# Altium PCB XoomFloppy Pro.PcbDoc (part 1 of 2)
Units mm, origin at the board's own origin, x right, y up, seen from the top; angles counter-clockwise.
Board outline 99.59 x 50.28 mm, 2 copper layers (Top Layer, Bottom Layer), stack 1.569 mm thick; 33 components, 43 nets, 246 pads, 112 vias.
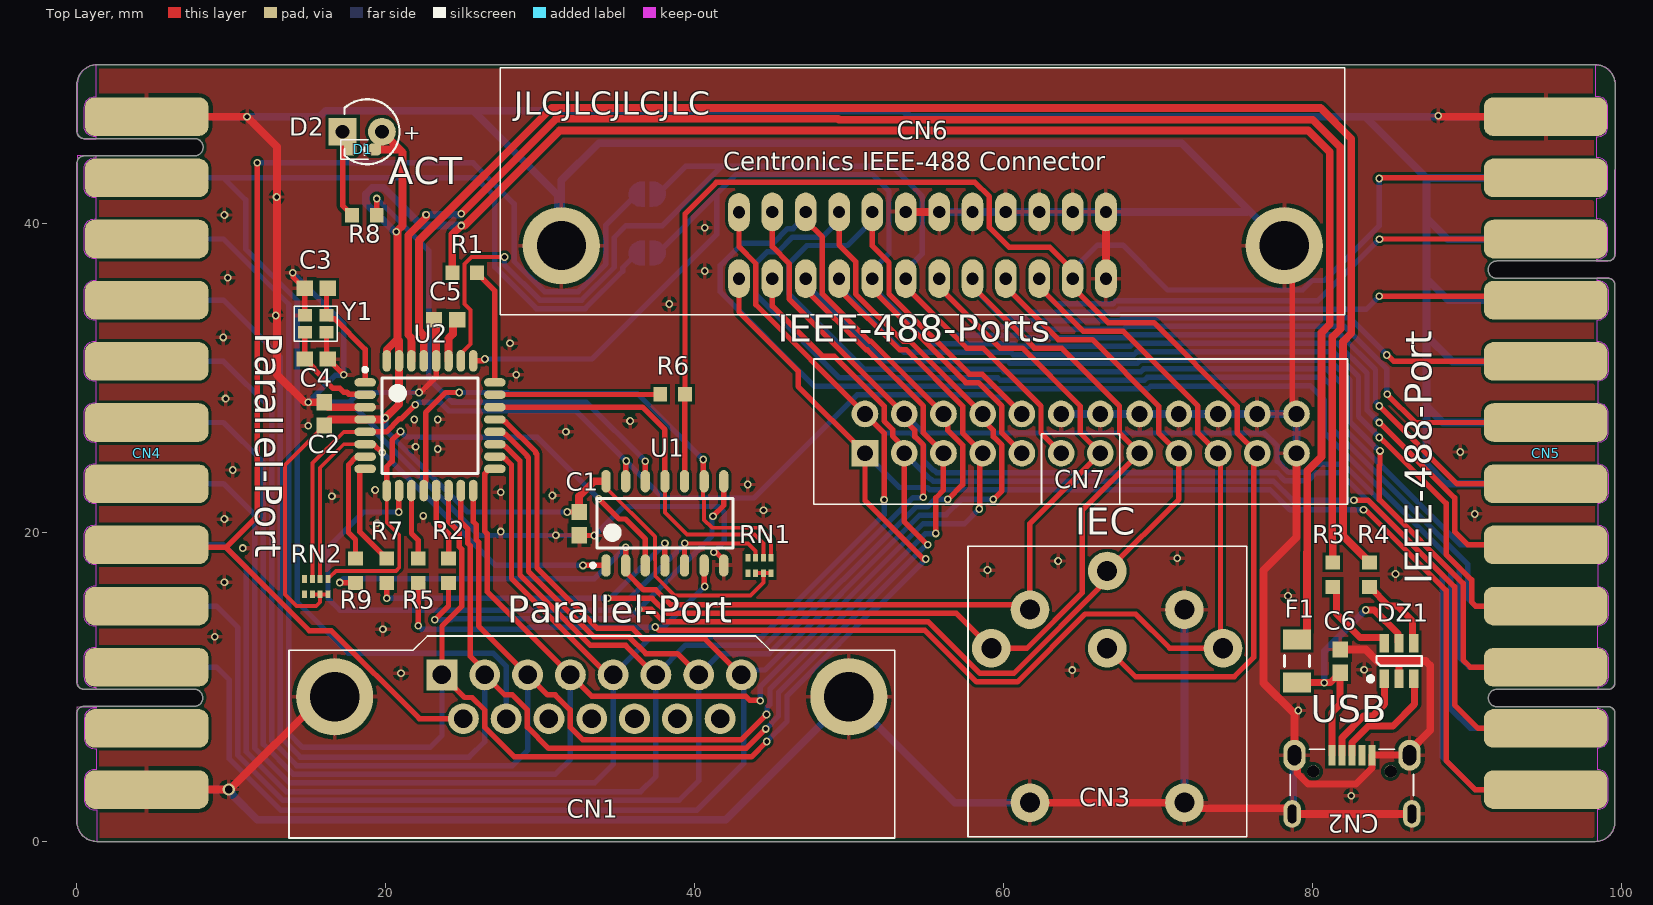
[diagram p0: Top Layer view]
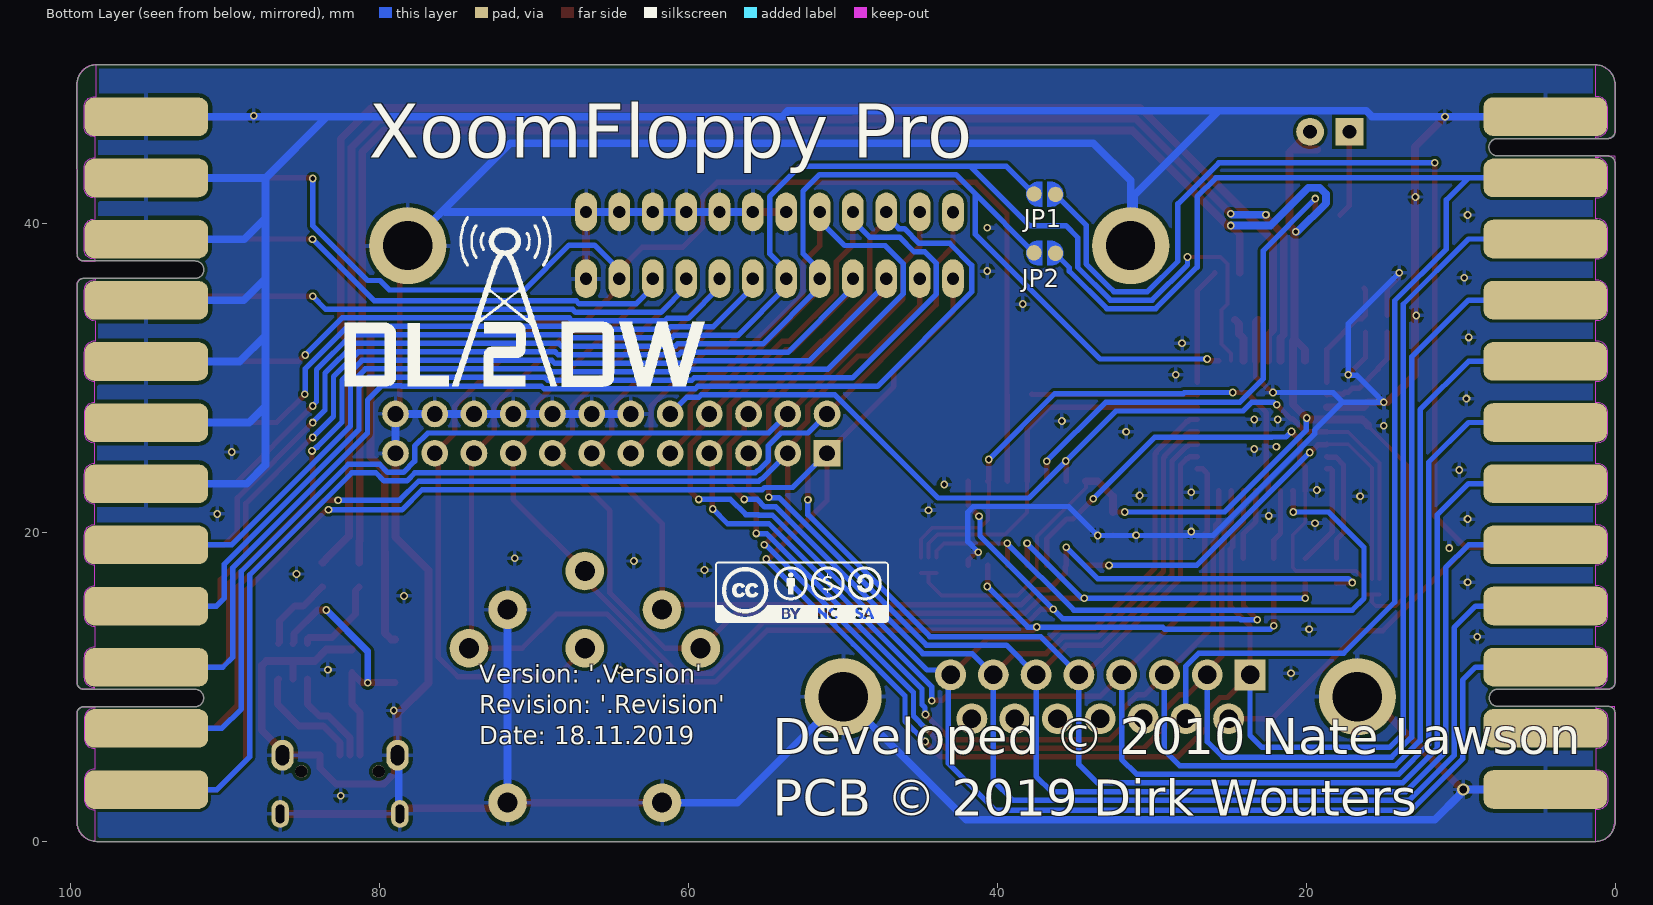
[diagram p1: Bottom Layer view, seen from below]

## Layer stack, top to bottom
Top Solder: solder mask 0.0254, SM-001, Dk 4
Top Layer: signal copper 0.035
Dielectric 1: core 1.4986, Core-043, Dk 4.3
Bottom Layer: signal copper 0.035
Bottom Solder: solder mask 0.0254, SM-001, Dk 4

## Board outline
0,1.271 0,8.32 cw(c0.424,8.32) 0.424,8.744 7.633,8.744 ccw(c7.581,9.305) 7.608,9.868 0.424,9.868 cw(c0.424,10.292) 0,10.292 0,43.924 cw(c0.466,43.924) 0.465,44.389 7.649,44.389 ccw(c7.609,44.951) 7.639,45.513 0.455,45.513 cw(c0.455,45.968) 0,45.968 0,49.014 cw(c1.27,49.014) 1.27,50.284 98.332,50.284 cw(c98.332,49.027) 99.588,49.027 99.581,38.032 cw(c99.137,38.032) 99.137,37.588 91.934,37.588 ccw(c91.934,37.026) 91.934,36.464 99.142,36.464 cw(c99.145,36.028) 99.581,36.03 99.58,10.282 cw(c99.149,10.283) 99.148,9.852 91.945,9.852 ccw(c91.945,9.29) 91.945,8.728 99.153,8.728 cw(c99.153,8.302) 99.579,8.303 99.581,1.27 cw(c98.311,1.27) 98.311,0 1.27,0 cw(c1.27,1.27)

## Design rules (kind name [scope] priority, off if disabled: settings)
BoardOutlineClearance [All] p1: gap=0.254 ignorepadtopadclearanceinfootprint=FALSE except(0.1: Track-OutlineEdge SMDPad-OutlineEdge)
Clearance [All] p1: gap=0.2 ignorepadtopadclearanceinfootprint=TRUE except(0: SMDPad-Region)
ComponentClearance [All] p1: gap=0 collisioncheckmode=3 verticalgap=0 showdistances=FALSE
HoleSize [All] p1: absolutevalues=TRUE maxlimit=5 minlimit=0.025 maxpercent=80.000 minpercent=20.000
MinimumSolderMaskSliver [All] p1: minsoldermaskwidth=0.103
PolygonConnect [All] p1: connectstyle=Relief reliefconductorwidth=0.254 reliefentries=4 polygonreliefangle="90 Angle" airgapwidth=0.254
RoutingVias [All] p1: holewidth=0.3 width=0.5 viastyle="Through Hole" minholewidth=0.3 minwidth=0.5 maxholewidth=0.5 maxwidth=0.8
SilkToSilkClearance [All] p1: silktosilkclearance=0
SilkToSolderMaskClearance [IsPad] p1: minsilkscreentomaskgap=0 clearancetoexposedcopper=TRUE
SolderMaskExpansion [All] p1: expansion=0.038 istentingtop=FALSE
Width [All] p1: maxlimit=0.5 minlimit=0.25 preferedwidth=0.35
25 further rules are at their usual default settings.

## Components (designator, comment, footprint, x,y, rotation, side; value= is the part's Value field where it differs from the comment)
C1 "100nF" "CAP 100nF SMD 0603 C0603C104J3RACTU" 32.512,20.586 r90 top
C2 "100nF" "CAP 100nF SMD 0603 C0603C104J3RACTU" 16.002,27.686 r270 top
C3 "22pF" "CAP 22pF SMD 0603 C0603C220J5RAC7867" 15.494,35.814 r0 top
C4 "22pF" "CAP 22pF SMD 0603 C0603C220J5RAC7867" 15.494,31.242 r180 top
C5 "1µF" "CAP 1µF SMD 0603 C0603C105K3RACTU" 23.876,33.782 r0 top
C6 "100nF" "CAP 100nF SMD 0603 C0603C104J3RACTU" 81.788,11.684 r270 top
CN1 "DSUB 15 Parallel Port" "D-SUB 15 Male Connector Right Angle 8.1mm" 23.636,10.792 r0 top locked
CN2 "MicroUSB" "MicroUSB Connector Right Angle Receptacle (Würth 629105150521)" 82.55,2.667 r0 top locked
CN3 "IEC Connector" "DIN 45322 Circular Connector (DIN-6)" 74.204,12.514 r180 top locked
CN4 "C64 Floppy-Speeder Parallelport" "C64 User Port" 4.521,25.146 r270 top locked
CN5 "Commodore CBM IEEE-488 EDGE Connector" "CBM IEEE-488 EDGE Connector" 95.087,25.146 r90 top locked
CN6 "Centronics IEEE-488 Connector" "GPIB Centronics Female 2x12pos. Connector" 42.865,36.442 r0 top locked
CN7 "IEEE-488 IDC Connector" "IEEE-488 IDC Header 2x12 P2.54mm Straight" 51.022,25.146 r270 top locked
D1 "LED Blue" "LED Blue SMD 0603" 18.491,44.806 r0 top
D2 "LED Blue" "LED 3mm Blue Straight" 17.203,45.956 r0 top
DZ1 "USBLC6-2SC6" USBLC6-2SC6 85.598,11.684 r90 top
F1 "1206L150THWR" "Littelfuse 1206L150THWR" 78.994,11.684 r90 top
JP1 "Solder Jumper Open" "Solder Jumper Open Variant 2" 36.925,41.91 r180 bottom
JP2 "Solder Jumper Open" "Solder Jumper Open Variant 2" 36.925,38.1 r180 bottom
R1 "10k" "10k Ohm R 0603 SMD" 25.108,36.83 r0 top
R2 "4k7" "4,7k Ohm R 0603 SMD" 24.06,17.526 r270 top
R3 "22" "22 Ohm R 0603 SMD" 81.312,17.272 r90 top
R4 "22" "22 Ohm R 0603 SMD" 83.686,17.272 r90 top
R5 "4k7" "4,7k Ohm R 0603 SMD" 22.098,17.526 r270 top
R6 "4k7" "4,7k Ohm R 0603 SMD" 38.57,28.956 r0 top
R7 "4k7" "4,7k Ohm R 0603 SMD" 20.066,17.526 r270 top
R8 "220" "220 Ohm R 0603 SMD" 18.612,40.54 r180 top
R9 "4k7" "4,7k Ohm R 0603 SMD" 18.034,17.526 r270 top
RN1 "100k" "RES ARRAY 4 RES 100K OHM 0804" 44.196,17.877 r270 top
RN2 "100k" "RES ARRAY 4 RES 100K OHM 0804" 15.498,16.502 r270 top
U1 "SN74LS06DR" "SN74LS06DR SOIC-14 P1.27mm W3.9mm" 38.069,20.602 r90 top locked
U2 "ATMEGA32U2-AU" "TQFP-32 P0.8mm 7x7mm ATMega32u2" 22.86,26.924 r0 top
Y1 "16MHz" "Crystal 16MHz SMD 2.0x1.6mm 4pos GND2-4" 15.462,33.528 r180 top

## Footprints (in the part's own frame and the unit in brackets; to place one, negate y for a bottom-side part, rotate by r counter-clockwise, add the part's x,y. Pads: shape width x height; smd on the part's side, far side on the other; paste and mask are expansions set on the pad)
"4,7k Ohm R 0603 SMD" [mm] "Chip Resistor 2-Leads, Body 1,60x0,80mm, IPC Medium Density"
  rect 0.9x0.95 smd: 1(-0.8,0) 2(0.8,0)
  body extent -0.8,-0.4 0.8,0.4, height 0.44
"10k Ohm R 0603 SMD" [mm] "Chip Resistor 2-Leads, Body 1,60x0,80mm, IPC Medium Density"
  rect 0.9x0.95 smd: 1(-0.8,0) 2(0.8,0)
  body extent -0.8,-0.4 0.8,0.4, height 0.45
"22 Ohm R 0603 SMD" [mm] "Chip Resistor 2-Leads, Body 1,60x0,80mm, IPC Medium Density"
  rect 0.9x0.95 smd: 1(-0.8,0) 2(0.8,0)
  body extent -0.8,-0.4 0.8,0.4, height 0.45
"220 Ohm R 0603 SMD" [mm] "Chip Resistor 2-Leads, Body 1,60x0,80mm, IPC Medium Density"
  rect 0.9x0.95 smd: 1(-0.8,0) 2(0.8,0)
  body extent -0.8,-0.4 0.8,0.4, height 0.45
"C64 User Port" [mm] "C64 User Port Edge Connector"
  rrect50% 2.5x8 smd paste-1.25: 1(-21.783,0) 2(-17.823,0) 3(-13.863,0) 4(-9.903,0) 5(-5.943,0) 6(-1.983,0) 7(1.983,0) 8(5.943,0) 9(9.903,0) 10(13.863,0) 11(17.823,0) 12(21.783,0)
  rrect50% 2.5x8 smd far side paste-1.25: A(-21.783,0) B(-17.823,0) C(-13.863,0) D(-9.903,0) E(-5.943,0) F(-1.983,0) H(1.977,0) J(5.937,0) K(9.897,0) L(13.857,0) M(17.817,0) N(21.777,0)
  Keep-Out Layer region: 16.408,-3.277 16.51,-3.277 16.51,-3.378 16.598,-3.708 16.84,-3.95 17.17,-4.039 17.17,-4.039 18.466,-4.039 18.718,-3.988 18.933,-3.845 19.076,-3.631 19.126,-3.378 19.126,-3.378 19.126,-3.277 20.498,-3.277 20.498,-3.404 20.546,-3.647 20.684,-3.853 20.89,-3.99 21.133,-4.039 21.133,-4.039 22.428,-4.039 22.681,-3.988 22.895,-3.845 23.038,-3.631 23.089,-3.378 23.089,-3.378 23.089,-3.251 25.146,-3.251 25.051,-3.727 24.782,-4.131 24.378,-4.401 23.901,-4.496 23.901,-4.496 16.408,-4.496
  Keep-Out Layer region: -25.145,-3.277 -24.958,-3.89 -24.496,-4.334 -23.876,-4.496 -23.876,-4.496 -20.828,-4.496 -20.599,-4.435 -20.432,-4.267 -20.371,-4.039 -20.371,-4.039 -20.371,-3.277 -20.472,-3.277 -20.472,-3.353 -20.525,-3.615 -20.673,-3.838 -20.896,-3.986 -21.158,-4.039 -21.158,-4.039 -22.403,-4.039 -22.746,-3.947 -22.997,-3.696 -23.089,-3.353 -23.089,-3.353 -23.089,-3.277
  Keep-Out Layer region: -19.253,-3.277 -19.253,-4.496 14.808,-4.496 14.993,-4.459 15.149,-4.354 15.254,-4.198 15.291,-4.013 15.291,-4.013 15.291,-3.277 15.189,-3.277 15.189,-3.327 15.135,-3.6 14.981,-3.83 14.75,-3.985 14.478,-4.039 14.478,-4.039 13.208,-4.039 12.965,-3.99 12.759,-3.853 12.621,-3.647 12.573,-3.404 12.573,-3.404 12.573,-3.277 11.201,-3.277 11.201,-3.378 11.151,-3.633 11.006,-3.849 10.79,-3.993 10.536,-4.044 10.536,-4.044 9.302,-4.044 8.943,-3.948 8.681,-3.685 8.585,-3.327 8.585,-3.327 8.585,-3.277 7.239,-3.277 7.239,-3.353 7.146,-3.7 6.892,-3.954 6.545,-4.047 6.545,-4.047 5.318,-4.048 5.061,-3.997 4.844,-3.852 4.699,-3.634 4.648,-3.378 4.648,-3.378 4.648,-3.277 3.277,-3.277 3.277,-3.378 3.226,-3.631 3.083,-3.845 2.869,-3.988 2.616,-4.039 2.616,-4.039 1.321,-4.039 1.078,-3.99 0.872,-3.853 0.734,-3.647 0.686,-3.404 0.686,-3.404 0.686,-3.277 -0.686,-3.277 -0.686,-3.378 -0.737,-3.634 -0.882,-3.852 -1.099,-3.997 -1.355,-4.048 -1.355,-4.048 -2.607,-4.048 -2.863,-3.997 -3.081,-3.852 -3.226,-3.634 -3.277,-3.378 -3.277,-3.378 -3.277,-3.277 -4.648,-3.277 -4.648,-3.378 -4.699,-3.634 -4.844,-3.852 -5.062,-3.997 -5.318,-4.048 -5.318,-4.048 -6.569,-4.048 -6.826,-3.997 -7.043,-3.852 -7.188,-3.634 -7.239,-3.378 -7.239,-3.378 -7.239,-3.277 -8.611,-3.277 -8.611,-3.378 -8.662,-3.634 -8.807,-3.852 -9.024,-3.997 -9.28,-4.048 -9.28,-4.048 -10.506,-4.048 -10.854,-3.955 -11.108,-3.7 -11.201,-3.353 -11.201,-3.353 -11.201,-3.277 -12.573,-3.277 -12.573,-3.378 -12.624,-3.634 -12.769,-3.852 -12.986,-3.997 -13.243,-4.048 -13.243,-4.048 -14.494,-4.048 -14.75,-3.997 -14.968,-3.852 -15.113,-3.634 -15.164,-3.378 -15.164,-3.378 -15.164,-3.277 -16.535,-3.277 -16.535,-3.404 -16.584,-3.65 -16.724,-3.859 -16.933,-3.999 -17.18,-4.048 -17.18,-4.048 -18.431,-4.048 -18.779,-3.955 -19.033,-3.7 -19.126,-3.353 -19.126,-3.353 -19.126,-3.277
"CAP 1µF SMD 0603 C0603C105K3RACTU" [mm] "Chip Capacitor, 2-Leads, Body 1,60x0,80mm, IPC Medium Density"
  rect 1.05x1 smd: 1(-0.75,0) 2(0.75,0)
  body extent -0.8,-0.4 0.8,0.4, height 0.87
"CAP 22pF SMD 0603 C0603C220J5RAC7867" [mm] "Chip Capacitor, 2-Leads, Body 1,60x0,80mm, IPC Medium Density"
  rect 1.05x1 smd: 1(-0.75,0) 2(0.75,0)
  body extent -0.8,-0.4 0.8,0.4, height 0.87
"CAP 100nF SMD 0603 C0603C104J3RACTU" [mm] "Chip Capacitor, 2-Leads, Body 1,60x0,80mm, IPC Medium Density"
  rect 1.05x1 smd: 1(-0.75,0) 2(0.75,0)
  body extent -0.8,-0.4 0.8,0.4, height 0.87
"CBM IEEE-488 EDGE Connector" [mm] "CBM IEEE-488 EDGE Connector"
  rrect50% 2.5x8 smd paste-1.25: 1(-21.783,0) 2(-17.823,0) 3(-13.863,0) 4(-9.903,0) 5(-5.943,0) 6(-1.983,0) 7(1.983,0) 8(5.943,0) 9(9.903,0) 10(13.863,0) 11(17.823,0) 12(21.783,0)
  rrect50% 2.5x8 smd far side paste-1.25: A(-21.783,0) B(-17.823,0) C(-13.863,0) D(-9.903,0) E(-5.943,0) F(-1.983,0) H(1.977,0) J(5.937,0) K(9.897,0) L(13.857,-0.002) M(17.817,0) N(21.777,0)
  Keep-Out Layer region: 16.512,-3.328 16.512,-3.362 16.564,-3.621 16.71,-3.841 16.93,-3.989 17.19,-4.04 17.19,-4.04 18.466,-4.04 18.718,-3.99 18.933,-3.847 19.076,-3.633 19.126,-3.38 19.126,-3.38 19.126,-3.327 20.498,-3.327 20.498,-3.405 20.546,-3.648 20.684,-3.854 20.89,-3.992 21.133,-4.04 21.133,-4.04 22.428,-4.04 22.681,-3.99 22.895,-3.847 23.038,-3.633 23.089,-3.38 23.089,-3.38 23.089,-3.253 25.146,-3.253 25.051,-3.729 24.782,-4.133 24.378,-4.403 23.901,-4.497 23.901,-4.497 16.51,-4.497 16.18,-4.497 12.908,-4.498 12.729,-4.462 12.577,-4.361 12.476,-4.209 12.44,-4.03 12.44,-4.03 12.44,-3.327 12.56,-3.327 12.56,-3.38 12.648,-3.71 12.89,-3.952 13.22,-4.04 13.22,-4.04 14.48,-4.04 14.741,-3.988 14.963,-3.84 15.112,-3.618 15.164,-3.356 15.164,-3.356 15.164,-3.328
  Keep-Out Layer region: -25.14,-3.353 -24.931,-3.933 -24.474,-4.346 -23.876,-4.496 -23.876,-4.496 -16.864,-4.496 -16.637,-4.435 -16.471,-4.269 -16.41,-4.041 -16.41,-4.041 -16.41,-3.353 -16.52,-3.353 -16.572,-3.615 -16.721,-3.838 -16.943,-3.986 -17.206,-4.039 -17.206,-4.039 -18.461,-4.039 -18.713,-3.989 -18.927,-3.846 -19.07,-3.632 -19.12,-3.38 -19.12,-3.38 -19.12,-3.353 -20.472,-3.353 -20.525,-3.615 -20.673,-3.838 -20.896,-3.986 -21.158,-4.039 -21.158,-4.039 -22.403,-4.039 -22.665,-3.986 -22.888,-3.838 -23.036,-3.615 -23.089,-3.353 -23.089,-3.353
  Keep-Out Layer region: -15.299,-3.367 -15.299,-4.001 -15.232,-4.249 -15.051,-4.43 -14.804,-4.496 -14.804,-4.496 10.894,-4.496 11.111,-4.438 11.27,-4.279 11.328,-4.062 11.328,-4.062 11.328,-3.327 11.201,-3.327 11.201,-3.378 11.151,-3.633 11.007,-3.849 10.79,-3.993 10.536,-4.044 10.536,-4.044 9.302,-4.044 9.027,-3.989 8.795,-3.834 8.64,-3.601 8.585,-3.327 8.585,-3.327 7.239,-3.327 7.239,-3.353 7.186,-3.618 7.036,-3.843 6.811,-3.994 6.545,-4.047 6.545,-4.047 5.318,-4.048 5.061,-3.997 4.844,-3.852 4.699,-3.634 4.648,-3.378 4.648,-3.378 3.277,-3.378 3.226,-3.631 3.083,-3.845 2.869,-3.988 2.616,-4.039 2.616,-4.039 1.321,-4.039 1.078,-3.99 0.872,-3.853 0.734,-3.647 0.686,-3.404 0.686,-3.404 0.686,-3.378 -0.686,-3.378 -0.737,-3.635 -0.882,-3.852 -1.099,-3.997 -1.355,-4.048 -1.355,-4.048 -2.607,-4.048 -2.863,-3.997 -3.081,-3.852 -3.226,-3.634 -3.277,-3.378 -3.277,-3.378 -4.648,-3.378 -4.699,-3.634 -4.844,-3.852 -5.061,-3.997 -5.318,-4.048 -5.318,-4.048 -6.569,-4.048 -6.826,-3.997 -7.043,-3.852 -7.188,-3.634 -7.239,-3.378 -7.239,-3.378 -8.611,-3.367 -8.66,-3.626 -8.804,-3.846 -9.022,-3.994 -9.28,-4.048 -9.28,-4.048 -10.506,-4.048 -10.772,-3.995 -10.998,-3.844 -11.149,-3.619 -11.201,-3.353 -11.201,-3.353 -12.573,-3.353 -12.573,-3.378 -12.624,-3.634 -12.769,-3.852 -12.986,-3.997 -13.243,-4.048 -13.243,-4.048 -14.494,-4.048 -14.75,-3.997 -14.968,-3.852 -15.113,-3.634 -15.164,-3.378 -15.164,-3.378
"Crystal 16MHz SMD 2.0x1.6mm 4pos GND2-4" [mm]
  rect 0.9x0.8 smd: 1(-0.7,-0.55) 2(0.7,-0.55) 3(0.7,0.55) 4(-0.7,0.55)
  silkscreen extent -1.4,-1.14 1.4,1.14, body extent -1.03,-0.82 1.02,0.83, height 0.45
"D-SUB 15 Male Connector Right Angle 8.1mm" [mm]
  rect 2x2 hole 1.2: 1(0,0)
  round 2 hole 1.2: 2(2.77,0) 3(5.54,0) 4(8.31,0) 5(11.08,0) 6(13.85,0) 7(16.62,0) 8(19.39,0) 9(1.385,-2.84) 10(4.155,-2.84) 11(6.925,-2.84) 12(9.695,-2.84) 13(12.465,-2.84) 14(15.235,-2.84) 15(18.005,-2.84)
  round 5 hole 3.2: 16(26.345,-1.42) 17(-6.955,-1.42)
  silkscreen extent -9.91,-10.56 29.31,2.51, body extent -9.9,-16.94 29.3,2.46, height 12.5
"DIN 45322 Circular Connector (DIN-6)" [mm]
  round 2.5 hole 1.3: 1(0,0) 2(2.5,-2.5) 3(7.5,0) 4(12.5,-2.5) 5(15,0) 6(7.5,-5) 7(2.5,10) 8(12.5,10)
  silkscreen extent -1.52,-6.6 16.51,12.19, body extent -3,-6.55 18,12.45, height 19.5
"GPIB Centronics Female 2x12pos. Connector" [mm]
  oval 1.4x2.5 hole 0.8: 1(0,0) 2(2.16,0) 3(4.32,0) 4(6.48,0) 5(8.64,0) 6(10.8,0) 7(12.96,0) 8(15.12,0) 9(17.28,0) 10(19.44,0) 11(21.6,0) 12(23.76,0) 13(0,4.3) 14(2.16,4.32) 15(4.32,4.32) 16(6.48,4.32) 17(8.64,4.32) 18(10.8,4.32) 19(12.96,4.32) 20(15.12,4.32) 21(17.28,4.32) 22(19.44,4.32) 23(21.6,4.32) 24(23.76,4.32)
  round 5 hole 3.18: Shield1(-11.5,2.14) Shield2(35.3,2.14)
  silkscreen extent -15.47,-2.35 39.23,13.65, body extent -15.47,-2.35 39.23,24.91, height 15.2
"IEEE-488 IDC Header 2x12 P2.54mm Straight" [mil]
  rect 68x68 hole 40: 1(0,0)
  round 68 hole 40: 2(0,100) 3(0,200) 4(0,300) 5(0,400) 6(0,500) 7(0,600) 8(0,700) 9(0,800) 10(0,900) 11(0,1000) 12(0,1100) 13(-100,0) 14(-100,100) 15(-100,200) 16(-100,300) 17(-100,400) 18(-100,500) 19(-100,600) 20(-100,700) 21(-100,800) 22(-100,900) 23(-100,1000) 24(-100,1100)
  silkscreen extent -240,-130 130,1230, body extent -240,-125 129,1225, height 365
"LED 3mm Blue Straight" [mm]
  rect 1.8x1.8 hole 0.9: 1(0,0)
  round 1.8 hole 0.9: 2(2.54,0)
  silkscreen extent 0.13,-2.1 3.68,2.1, body extent -0.25,-1.75 3.02,1.75, height 5.1
"LED Blue SMD 0603" [mm]
  rrect50% 0.8x0.75 smd: 1(-0.8,0) 2(0.8,0)
  silkscreen extent -1.4,-0.64 0.38,0.64, body extent -0.8,-0.4 0.8,0.4, height 0.4
"Littelfuse 1206L150THWR" [mm] "Littelfuse 1206L150THWR"
  rect 1.3x1.8 smd: 1(-1.4,0) 2(1.4,0)
  silkscreen extent -0.35,-0.8 0.35,0.8, body extent -1.65,-0.81 1.65,0.82, height 0.82
"MicroUSB Connector Right Angle Receptacle (Würth 629105150521)" [mm]
  rect 0.45x1.3 smd: 1(-1.295,2.921) 2(-0.645,2.921) 3(0.005,2.921) 4(0.655,2.921) 5(1.305,2.921)
  oval 1.45x2 hole 1.3 slot 0.85 at 0 deg: 6(-3.72,2.921) 7(3.73,2.921)
  oval 1.15x1.8 hole 1.2 slot 0.55 at 0 deg: 8(-3.87,-0.879) 9(3.88,-0.879)
  round 0.8 hole 0.8 unplated: 10(-2.495,1.871) 11(2.505,1.871)
  silkscreen extent -3.99,0.3 3.99,3.3, body extent -4,-3.3 4,3.3, height 2.77
"RES ARRAY 4 RES 100K OHM 0804" [mm] "Chip Array, Concave, 8-Leads, Pitch 0,50mm,  Body 2,00x1,00mm,  IPC Medium Density"
  rect 0.5x0.32 smd: 1(-0.5,0.75) 2(-0.5,0.25) 3(-0.5,-0.25) 4(-0.5,-0.75) 5(0.5,-0.75) 6(0.5,-0.25) 7(0.5,0.25) 8(0.5,0.75)
  body extent -0.5,-1 0.5,1, height 0.4
"SN74LS06DR SOIC-14 P1.27mm W3.9mm" [mm] "SOIC, 14-Leads, Body 8,65x3,90mm, Pitch 1,27mm, IPC Medium Density"
  oval 1.45x0.6 smd: 1(-2.725,3.81) 2(-2.725,2.54) 3(-2.725,1.27) 4(-2.725,0) 5(-2.725,-1.27) 6(-2.725,-2.54) 7(-2.725,-3.81) 8(2.725,-3.81) 9(2.725,-2.54) 10(2.725,-1.27) 11(2.725,0) 12(2.725,1.27) 13(2.725,2.54) 14(2.725,3.81)
  silkscreen extent -2.85,-4.4 1.6,4.78, body extent -3.01,-4.32 2.99,4.32, height 1.54
"Solder Jumper Open Variant 2" [mm]
  round 1 smd paste-1 mask-1: 1(-0.695,0.016) 2(0.695,-0.016)
  Top Layer region: -0.165,-0.804 -0.378,-0.804 -0.695,-0.741 -0.964,-0.561 -1.143,-0.292 -1.206,0.025 -1.206,0.025 -1.147,0.323 -0.978,0.576 -0.725,0.745 -0.427,0.804 -0.427,0.804 -0.165,0.804
  Top Layer region: 0.165,0.804 0.378,0.804 0.695,0.741 0.964,0.561 1.143,0.292 1.207,-0.025 1.207,-0.025 1.147,-0.323 0.978,-0.576 0.725,-0.745 0.427,-0.804 0.427,-0.804 0.165,-0.804
"TQFP-32 P0.8mm 7x7mm ATMega32u2" [mm] "TQFP, 32-Leads, Body 7,00x7,00mm, Pitch 0,80mm, IPC Medium Density"
  oval 1.4x0.55 smd: 1(-4.2,2.8) 2(-4.2,2) 3(-4.2,1.2) 4(-4.2,0.4) 5(-4.2,-0.4) 6(-4.2,-1.2) 7(-4.2,-2) 8(-4.2,-2.8) 17(4.2,-2.8) 18(4.2,-2) 19(4.2,-1.2) 20(4.2,-0.4) 21(4.2,0.4) 22(4.2,1.2) 23(4.2,2) 24(4.2,2.8)
  oval 0.55x1.4 smd: 9(-2.8,-4.2) 10(-2,-4.2) 11(-1.2,-4.2) 12(-0.4,-4.2) 13(0.4,-4.2) 14(1.2,-4.2) 15(2,-4.2) 16(2.8,-4.2) 25(2.8,4.2) 26(2,4.2) 27(1.2,4.2) 28(0.4,4.2) 29(-0.4,4.2) 30(-1.2,4.2) 31(-2,4.2) 32(-2.8,4.2)
  silkscreen extent -4.32,-3.1 3.1,3.75, body extent -4.5,-4.5 4.5,4.5, height 1.3
USBLC6-2SC6 [mm] "ESD Suppressors / TVS Diodes ESD Protection Low Cap"
  rect 1.2x0.6 smd: 1(-1.15,0.95) 2(-1.15,0) 3(-1.15,-0.95) 4(1.15,-0.95) 5(1.15,0) 6(1.15,0.95)
  silkscreen extent -1.25,-1.46 0.32,1.94, body extent -1.4,-1.46 1.4,1.46, height 1.17

## Part data
C1 C2 C6: library part CMP-Capacitors-Ceramic_Capacitors-00012-1, "KEMET         C0603C104J3RACTU             SMD Multilayer Ceramic Capacitor, 0603 [1608 Metric], 0.1 F, 25 V,  5%, X7R, C Series", Case Code (Imperial)=0603, Case Code (Metric)=1608, Dielectric=X7R, Dielectric Material=Ceramic, Max Operating Temperature=125°C, Min Operating Temperature=-55°C, Package Quantity=4000, Tolerance=5%, Voltage=25V, Capacitance=100nF, Case/Package=0603, Contact Plating=Tin,Matte, Depth=0.8mm, Height=0.8mm, Lead Pitch=0.7mm, Length=1.6mm, Mount="Surface Mount,PCB", Number of Pins=2, Packaging="Tape and Reel", Radiation Hardening=No, REACH SVHC="No SVHC", Termination=SMD/SMT, Thickness=0.034inch, Voltage Rating=25V, Voltage Rating (DC)=25V, Width=0.031inch
C3 C4: library part CMP-Capacitors-Ceramic_Capacitors-00013-1, "22.0PF 50.0V", Capacitance=2.2E-11F, Case/Package=0603, Dielectric=X7R, Dielectric Material=Ceramic, Tolerance=5%, Voltage Rating (DC)=50V
C5: library part CMP-Capacitors-Ceramic_Capacitors-00014-1, "KEMET 1F Multilayer Ceramic Capacitor (MLCC) 25 V 10% X7R dielectric C SMD max op. temp. +125C", Capacitance=1uF, Case Code (Imperial)=0603, Case Code (Metric)=1608, Dielectric=X7R, Dielectric Material=Ceramic, Max Operating Temperature=125°C, Min Operating Temperature=-55°C, Package Quantity=1, Tolerance=10%, Voltage=25V, Case/Package=0603, Depth=0.8mm, Dissipation Factor=5%, Height=0.8mm, Length=1.6mm, Mount="Surface Mount", Packaging="Tape and Reel", REACH SVHC="No SVHC", Termination=SMD/SMT, Thickness=0.034inch, Voltage Rating=25V, Voltage Rating (DC)=25V, Width=0.031inch
CN1: library part CMP-D-SUB_Connectors-00000-6, "HARTING         09 64 223 7802             Filtered D Sub Connector, Ferrite, DA, Plug, 15 Contacts, 0 F, Steel Body", Capacitance=0pF, Current Rating=7.5A, Max Operating Temperature=105°C, Min Operating Temperature=-55°C, Package Quantity=70, Voltage Rating=250V, Body Material=Steel, Connector Type=D-Sub,Plug,Signal, Contact Plating=Gold, Depth=12.5mm, Gender=Male, Housing Material=PBT, Length=39.2mm, Material=Polybutylene, Mount="Through Hole,Panel", Number of Contacts=15, Number of Positions=15, Number of Rows=2, Orientation="Right Angle", Packaging=Bulk, Pitch=2.77mm, REACH SVHC="No SVHC", Termination=Solder, Width=18.5mm
CN2: library part CMP-Connectors-USB_Connectors-00001-1, "Socket micro-USB B 5P, 629105150521, Würth Elektronik", Connector Type=USB, Contact Material="Copper Alloy", Contact Plating=Gold, Features=Shielded, Gender=Receptacle, Lead Free="Lead Free", Mount="Surface Mount,Horizontal", Number of Contacts=5, Orientation="Right Angle", Packaging="Tape and Reel", REACH SVHC=Unknown, Termination=SMD/SMT, USB Standard="USB 2.0"
CN3: library part CMP-Connectors-DIN_Connectors00000-3, "DIN chassis socket, right angle version, with ground contact, suitable for locking, for printed circuit boards"
CN4: library part CMP-Commodore-00005-4, "EDGE Connector like C64 Userport for \"SpeedDOS\""
CN5: library part CMP-Commodore-00003-4, "PCB connector for connecting IEEE-488 devices"
CN6: library part CMP-Connectors-00013-5, "L-COM - CIB24SRA - CONNECTOR GPIB R/A FEMALE"
CN7: library part CMP-Commodore-00004-4, "IEEE-488 IDC Connector Right Angle or Straight"
D1: library part CMP-LEDs-00001-1, "LED BLUE DIFFUSED 0603 SMD", Case/Package=0603, Color=Blue, Forward Voltage=3.2V, Test Current=20mA, Dominant Wavelength=470nm, Height=0.5mm, Length=1.6mm, Lens Size=0.8mm, Lens Style=Flat, Lens Transparency=Diffused, Luminous Intensity=80mcd, Mount="Surface Mount", Packaging="Tape and Reel", Viewing Angle=140°, Width=0.8mm
D2: library part CMP-LEDs-0000-4, "WURTH ELEKTRONIK   151033BS03000   LED, 3MM, BLUE, 3800MCD, 470NM", Case/Package=Radial, Color=Blue, Forward Current=30mA, Forward Voltage=2.8V, Max Operating Temperature=85°C, Min Operating Temperature=-40°C, Package Quantity=1, Test Current=20mA, Dominant Wavelength=470nm, Height=5.55mm, Lens Size=3mm, Lens Style=Clear,Circular,Round, Luminous Intensity=3800mcd, Mount="Through Hole", Packaging=Bulk, REACH SVHC=Unknown, Viewing Angle=30°, Wavelength=470nm
DZ1: library part CMP-Diodes-00005-3, "TVS DIODE 5.25V 17V SOT23-6", Breakdown Voltage=6V, Capacitance=3.5pF, Case/Package=SOT-23, Clamping Voltage=17V, Leakage Current=150nA, Max Operating Temperature=125°C, Min Operating Temperature=-40°C, Operating Supply Voltage=1.1V, Package Quantity=3000, Peak Pulse Current=5A, Power Line Protection=Yes, Reverse Standoff Voltage=5.25V, Test Current=1mA, Working Voltage=5V, Contact Plating=Tin,Matte, Data Rate=480Mbps, Depth=1.75mm, Direction=Unidirectional,Bidirectional, Element Configuration=Dual, ESD Protection=Yes, Height=1.3mm, Lead Free="Lead Free", Length=3.05mm, Max Breakdown Voltage=6V, Max Reverse Leakage Current=150nA, Min Breakdown Voltage=6V, Mount="Surface Mount", Number of Bidirectional Channels=2, Number of Channels=2, Number of Elements=1, Number of Pins=6, Packaging="Tape and Reel", Polarity=Unidirectional,Bidirectional, Radiation Hardening=No, REACH SVHC="No SVHC", Reverse Breakdown Voltage=6V, Termination=SMD/SMT, Width=1.75mm
F1: library part CMP-Fuses-0001-1, "PTC RESET FUSE 8V 1.5A 1206", Case Code (Imperial)=1206, Case Code (Metric)=3216, Current Rating=100A, Hold Current=1.5A, Max Operating Temperature=85°C, Max Voltage Rating (DC)=8V, Min Operating Temperature=-40°C, Package Quantity=3000, Power Dissipation=800mW, Resistance=120mR, Trip Current=3A, Working Voltage=6V, Approvals=cULus,TUV, Case/Package=1206, Height=0.75mm, Lead Free="Lead Free", Length=3.4mm, Max Current Rating=100A, Operating Supply Voltage=8V, Packaging="Tape and Reel", REACH SVHC=Unknown, Terminal Material=Copper, Termination=SMD/SMT, Time to Trip=0.3s, Voltage Rating=8V, Voltage Rating (DC)=8V, Width=1.8mm
JP1 JP2: library part CMP-Mechanicals-00016-12
R1: library part CMP-Resistors-Yageo_SMD_0805-0170-1, "RES SMD 10K OHM 1% 1/10W 0603", Case Code (Imperial)=0603, Case Code (Metric)=1608, Max Operating Temperature=155°C, Min Operating Temperature=-55°C, Power Rating=100mW, Resistance=10kR, Temperature Coefficient=100ppm/°C, Tolerance=1%, Voltage Rating=75V, Voltage Rating (DC)=50V, Case/Package=0603, Composition="Thick Film", Depth=0.8mm, Height=0.45mm, Lead Free="Lead Free", Lead Pitch=0.3mm, Length=1.6mm, Military Standard=Not, Number of Pins=2, Packaging="Tape and Reel", REACH SVHC="No SVHC", Termination=SMD/SMT, Weight=7.1E-05oz, Width=0.8mm
R2 R5 R6 R7 R9: library part CMP-Resistors-Yageo_SMD_0805-0169-1, "RES SMD 4.7K OHM 1% 1/10W 0603", Case Code (Imperial)=0603, Case Code (Metric)=1608, Max Operating Temperature=155°C, Min Operating Temperature=-55°C, Power Rating=100mW, Resistance=4.7kR, Temperature Coefficient=100ppm/°C, Tolerance=1%, Voltage Rating=50V, Case/Package=0603, Composition="Thick Film", Depth=0.8mm, Height=0.45mm, Lead Free="Lead Free", Lead Pitch=0.3mm, Length=1.6mm, Military Standard=Not, Number of Pins=2, Packaging="Tape and Reel", REACH SVHC="No SVHC", Termination=SMD/SMT, Voltage Rating (DC)=50V, Width=0.8mm
R3 R4: library part CMP-Resistors-Yageo_SMD_0805-0172-1, "RES SMD 22 OHM 1% 1/10W 0603", Case Code (Imperial)=0603, Case Code (Metric)=1608, Max Operating Temperature=155°C, Max Power Dissipation=100mW, Min Operating Temperature=-55°C, Package Quantity=1, Resistance=22R, Temperature Coefficient=100ppm/°C, Tolerance=1%, Voltage Rating=50V, Case/Package=0603, Composition="Thick Film", Depth=0.8mm, Features="Moisture Resistant", Height=0.022inch, Lead Free="Lead Free", Length=1.6mm, Military Standard=Not, Number of Pins=2, Number of Terminations=2, Packaging="Tape and Reel", Power Rating=100mW, REACH SVHC="No SVHC", Termination=SMD/SMT, Voltage Rating (DC)=50V, Width=0.031inch
R8: library part CMP-Resistors-Yageo_SMD_0805-0171-1, "RES SMD 220 OHM 1% 1/10W 0603", Case Code (Imperial)=0603, Case Code (Metric)=1608, Max Operating Temperature=155°C, Max Power Dissipation=100mW, Min Operating Temperature=-55°C, Package Quantity=1, Resistance=220R, Temperature Coefficient=100ppm/°C, Tolerance=1%, Voltage Rating=50V, Case/Package=0603, Composition="Thick Film", Depth=0.8mm, Features="Moisture Resistant", Height=0.022inch, Lead Free="Lead Free", Length=1.6mm, Military Standard=Not, Number of Pins=2, Number of Terminations=2, Packaging="Tape and Reel", Power Rating=100mW, REACH SVHC="No SVHC", Termination=SMD/SMT, Voltage Rating (DC)=50V, Width=0.031inch
RN1 RN2: library part CMP-Resistors-00011-2, "RES ARRAY 4 RES 100K OHM 0804", Case/Package=0804, Max Operating Temperature=125°C, Min Operating Temperature=-55°C, Number of Resistors=4, Power Per Element=62.5mW, Resistance=100kR, Temperature Coefficient=200ppm/°C, Tolerance=1%, Circuit Type=Isolated, Height=0.02inch, Length=0.079inch, Mount="Surface Mount", Number of Circuits=4, Number of Pins=8, Packaging="Tape and Reel", Width=0.039inch
U1: library part CMP-ICs-74xx-series-00051-2, "IC INVERTER OPEN COL 6CH 14SOIC", Case/Package=SOIC, High Level Output Current=-250uA, Low Level Output Current=40mA, Max Operating Temperature=70°C, Max Supply Voltage=5.25V, Min Operating Temperature=0°C, Min Supply Voltage=4.75V, Operating Supply Voltage=5V, Package Quantity=1, Contact Plating=Gold, Lead Free="Lead Free", Logic Function=Buffer,Inverter, Mount="Surface Mount", Number of Bits=6, Number of Channels=6, Number of Circuits=6, Number of Elements=6, Number of Gates=6, Number of Input Lines=6, Number of Inputs=6, Number of Output Lines=6, Number of Outputs=6, Number of Pins=14, Packaging="Tape and Reel", Polarity=Inverting, Propagation Delay=20ns, Radiation Hardening=No, REACH SVHC="No SVHC", Turn-On Delay Time=20ns
U2: library part CMP-ICs-00001-3, "ATMEL         ATMEGA32U2-AU            MCU, 8BIT, MEGAAVR, 16MHZ, TQFP-32", Case/Package=A, Frequency=16MHz, Max Operating Temperature=85°C, Max Supply Voltage=5.5V, Min Operating Temperature=-40°C, Min Supply Voltage=2.7V, Package Quantity=1250, Contact Plating=Tin,Matte, Core Architecture=AVR, Data Bus Width=8b, Density=32KB, Height=1.05mm, Interface=SPI,USB,UART,USART, Lead Free="Lead Free", Length=7mm, Max Frequency=16MHz, Memory Size=32KB, Memory Type=FLASH, Mount="Surface Mount", Number of I/Os=22, Number of Pins=32, Number of Programmable I/O=22, Number of PWM Channels=5, Number of SPI Channels=1, Number of Timers/Counters=2, Oscillator Type=Internal, Packaging=Tray, Peripherals="Brown-out Detect/Reset,POR,PWM,WDT", Radiation Hardening=No, RAM Size=1KB, REACH SVHC="No SVHC", Termination=SMD/SMT, Watchdog Timer=Yes, Width=7mm
Y1: library part CMP-Crystals_Oscilators-00001-1, "16MHz ±10ppm 9pF 200Ω SMD,2.0x1.6mm SMD Crystal Resonators RoHS"

## Via types
v1: diameter 0.5, hole 0.3, Top Layer to Bottom Layer, tented both sides, 111 vias
v2: diameter 0.8, hole 0.5, Top Layer to Bottom Layer, tented both sides, 1 vias

## Nets (pads, with @x,y where several pads share a name; then routed paths per layer and width w, separated by ;. In a path a pad name is that pad's centre, name@x,y a point inside that pad or via, vN(x,y) a via of type N, cw(c..) or ccw(c..) an arc to the next point about the centre after c; other vN are vias at no path point)
+5V: C1.2 C2.2 D1.2 D2.2 F1.2 R1.1 RN1.6 RN1.7 RN1.8 RN2.6 RN2.7 RN2.8 U1.14 U2.4 U2.31 U2.32 | length 184.8
  Top Layer w0.25: RN2.6@15.248,16.002 RN2.7@15.748,16.002 ; C2.2@16.002,26.936 16.002,26.911 13.462,24.371 13.462,16.002 14.224,15.24 15.494,15.24 15.748,15.494 RN2.7@15.748,16.002 ; RN2.8@16.248,16.002 RN2.7@15.748,16.002 ; U1.14@34.259,23.327 34.259,22.902 37.424,19.737 37.424,18.234 37.444,18.214 37.444,17.193 38.702,15.935 43.621,15.935 44.446,16.76 RN1.7@44.446,17.377 ; RN1.6@43.946,17.377 RN1.7@44.446,17.377 ; RN1.8@44.946,17.377 RN1.7@44.446,17.377
  Top Layer w0.35: v1(31.75,21.336) C1.2@32.512,21.336
  Top Layer w0.5: C2.2@16.002,26.936 16.002,26.961 16.252,27.211 16.277,27.211 16.39,27.324 19.873,27.324 20.86,28.311 U2.31@20.86,31.124 20.85,31.134 20.85,32.416 20.751,32.516 ; D1.2@19.291,44.806 20.893,44.806 ; D2.2@19.743,45.956 20.893,44.806 ; U2.32@20.06,31.124 20.07,31.134 20.07,31.834 20.751,32.516 ; v1(20.68,39.476) 20.751,39.404 20.751,32.516 ; v1@20.751,39.547 21.082,39.878 21.082,44.617 20.893,44.806 ; R1.1@24.308,36.83 24.308,39.307 v1(24.879,39.878) 25.094,39.878 31.252,46.036 79.72,46.036 81.115,44.641 81.115,33.489 80.578,32.952 80.578,24.904 79.662,23.988 79.662,18.745 79.644,18.727 79.644,13.484 79.244,13.084 F1.2@78.994,13.084 ; C1.2@32.512,21.336 32.512,22.352 33.487,23.327 U1.14@34.259,23.327
  Bottom Layer w0.35: v1(19.969,27.421) 19.998,27.392 19.998,26.611 25.273,21.336 v1(31.75,21.336)
  Bottom Layer w0.5: v1(20.68,39.476) 20.573,39.476 18.712,41.337 18.712,41.917 19.122,42.327 19.867,42.327 22.316,39.878 v1(24.879,39.878)
\F\L\A\G\2\: CN1.10 CN4.B JP2.2 | length 87.6
  Bottom Layer w0.35: CN4.B@4.521,42.969 9.493,42.969 ; CN1.10@27.791,7.952 27.791,11.351 26.95,12.192 17.568,12.192 14.266,15.494 14.266,35.014 10.922,38.358 10.922,41.54 9.493,42.969 ; JP2.2@36.23,38.084 36.23,38.056 35.34,37.166 35.34,36.935 32.907,34.502 29.744,34.502 27.061,37.185 27.061,41.757 25.849,42.969 9.493,42.969
\P\C\2\: CN1.9 CN4.8 JP1.2 | length 85.1
  Top Layer w0.35: CN4.8@4.521,19.203 4.674,19.05 9.652,19.05 ; v1(11.684,43.942) 11.684,21.082 9.652,19.05 ; CN1.9@25.021,7.952 22.167,7.952 16.46,13.659 15.043,13.659 9.652,19.05
  Bottom Layer w0.35: v1(11.684,43.942) 25.654,43.942 28.311,41.285 28.311,37.57 30.279,35.602 32.451,35.602 32.796,35.947 34.24,37.391 34.24,39.904 JP1.2@36.23,41.894
\R\E\S\E\T\: R1.2 U2.24 | length 7.6
  Top Layer w0.35: R1.2@25.908,36.83 25.908,36.805 27.06,35.653 U2.24@27.06,29.724
ATN: CN3.3 CN5.11 CN6.11 CN7.11 R6.2 U1.10 | length 127.2
  Top Layer w0.35: U1.10@39.339,23.327 39.354,23.343 39.354,28.94 R6.2@39.37,28.956 39.37,40.64 41.402,42.672 58.145,42.672 59.07,41.747 59.07,39.767 60.357,38.48 62.977,38.48 64.465,36.992 CN6.11@64.465,36.442 64.465,35.892 66.762,33.595 69.725,33.595 75.121,28.199 75.121,26.447 CN7.11@76.422,25.146 76.2,24.924 76.2,11.938 74.93,10.668 68.55,10.668 CN3.3@66.704,12.514 ; v1(84.328,42.926) 84.371,42.969 CN5.11@95.087,42.969
  Bottom Layer w0.35: CN6.11@64.465,36.442 64.465,36.992 66.081,38.608 67.715,38.608 70.616,35.707 79.356,35.707 79.971,36.322 80.772,36.322 84.328,39.878 v1(84.328,42.926)
"ATN IN": R6.1 U2.23 | length 10.7
  Top Layer w0.35: U2.23@27.06,28.924 27.076,28.94 37.754,28.94 R6.1@37.77,28.956
"ATN OUT": RN1.2 U1.11 U2.22 | length 25.1
  Top Layer w0.25: U1.11@38.069,23.327 38.069,21.313 39.502,19.879 40.921,19.879 40.93,19.87 43.873,19.87 44.446,19.297 RN1.2@44.446,18.377
  Top Layer w0.35: U2.22@27.06,28.124 36.615,28.124 38.069,26.67 U1.11@38.069,23.327
"CLK IN": R9.1 U2.7 | length 7.5
  Top Layer w0.35: R9.1@18.034,18.326 18.034,19.555 17.585,20.004 17.585,24.393 18.077,24.886 18.622,24.886 U2.7@18.66,24.924
"CLK OUT": RN2.2 U1.1 U2.6 | length 29.6
  Top Layer w0.25: RN2.2@15.748,17.002 15.748,24.2 17.272,25.724 U2.6@18.66,25.724
  Top Layer w0.35: U2.6@18.66,25.724 18.698,25.686 19.246,25.686 19.746,25.186 v1(19.761,25.186) ; v1(32.766,17.877) U1.1@34.259,17.877
  Bottom Layer w0.35: v1(19.761,25.186) 19.786,25.186 27.096,17.877 v1(32.766,17.877)
D+: R4.2 U2.29 | length 101
  Top Layer w0.5: U2.29@22.46,31.124 22.46,32.787 22.151,33.096 22.151,38.915 30.734,47.498 80.518,47.498 82.515,45.501 82.515,32.909 81.978,32.372 81.978,19.78 83.461,18.297 83.461,18.272 83.661,18.072 R4.2@83.686,18.072
D-: R3.2 U2.30 | length 99.7
  Top Layer w0.5: U2.30@21.66,31.124 21.66,32.597 21.451,32.806 21.451,39.257 22.606,40.412 v1(22.606,40.578) ; v1(24.879,40.653) 31.024,46.798 49.276,46.798 49.338,46.736 80.01,46.736 81.815,44.931 81.815,33.199 81.278,32.662 81.278,19.49 81.312,19.456 R3.2@81.312,18.072
  Bottom Layer w0.5: v1(22.606,40.578) 24.804,40.578 v1(24.879,40.653)